# Altium PCB TriMod Adapter 2.PcbDoc (part 2 of 2)
Units mm, origin at the board's own origin, x right, y up, seen from the top; angles counter-clockwise.
Board outline 35.81 x 82.55 mm, 2 copper layers (Top Layer, Bottom Layer), stack 0.969 mm thick; 35 components, 110 nets, 330 pads, 112 vias.
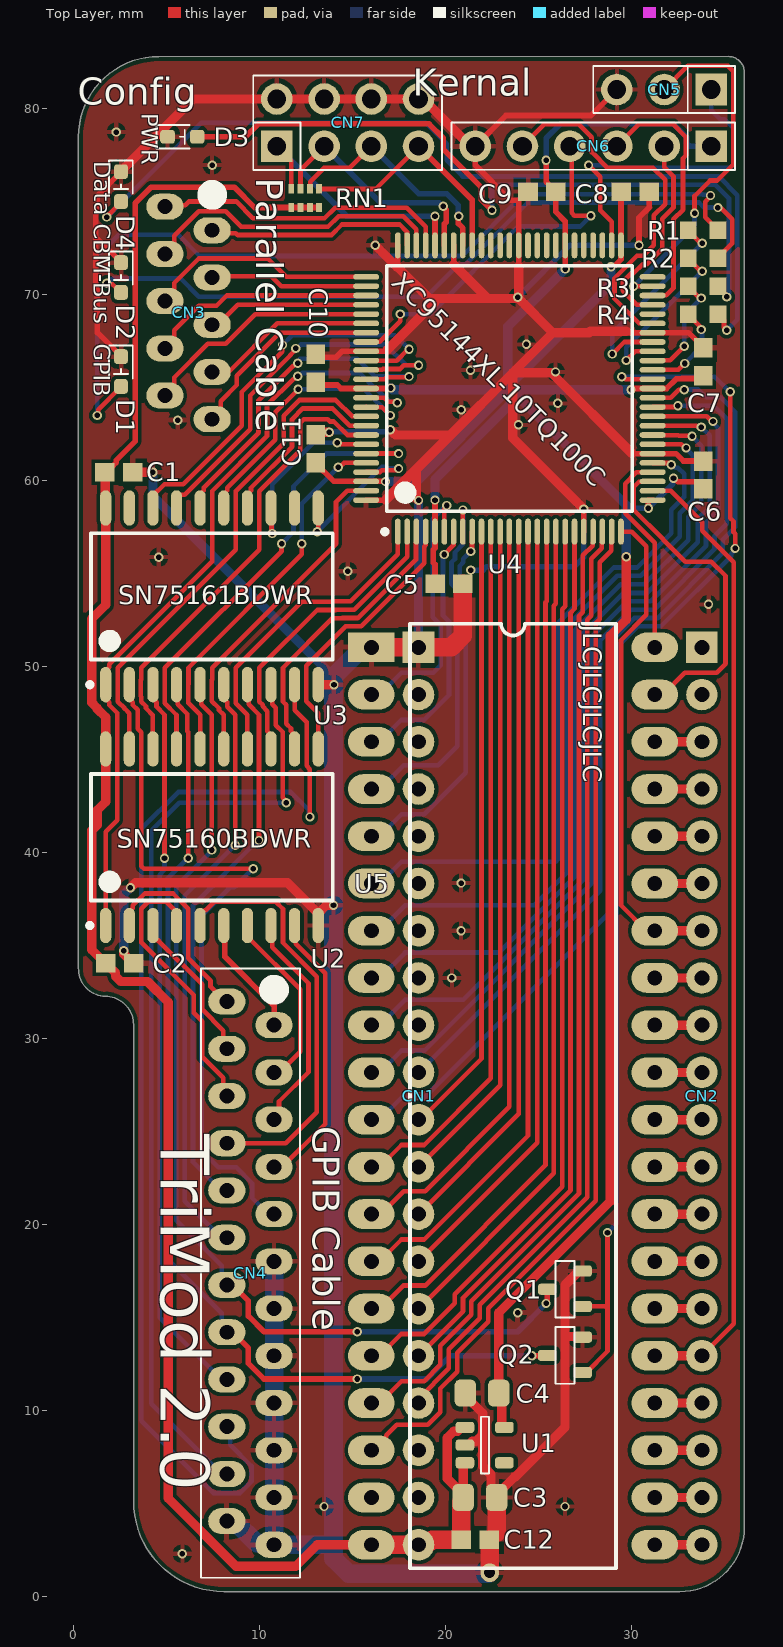
[diagram p0: Top Layer view]

## Via types
v1: diameter 0.5, hole 0.3, Top Layer to Bottom Layer, tented both sides, 111 vias
v2: diameter 1, hole 0.6, Top Layer to Bottom Layer, tented both sides, 1 vias

## Nets (pads, with @x,y where several pads share a name; then routed paths per layer and width w, separated by ;. In a path a pad name is that pad's centre, name@x,y a point inside that pad or via, vN(x,y) a via of type N, cw(c..) or ccw(c..) an arc to the next point about the centre after c; other vN are vias at no path point) (continued)
VIA_PB3: (continued)
  Top Layer w0.25: U5.13 16.51,20.55 17.743,21.783 18.896,21.783 23.428,26.314 23.428,55.773 U4.13
VIA_PB4: U4.15 U5.14 | length 43.7
  Top Layer w0.25: U5.14 16.452,18.01 17.627,19.185 18.839,19.185 24.428,24.774 U4.15
VIA_PB5: U4.17 U5.15 | length 46.7
  Top Layer w0.25: U5.15 16.486,15.47 17.725,16.709 18.902,16.709 25.367,23.173 25.367,53.446 25.428,53.507 U4.17
VIA_PB6: U4.19 U5.16 | length 49.6
  Top Layer w0.25: U5.16 16.452,12.93 17.627,14.105 18.839,14.105 20.485,15.751 20.485,16.236 26.267,22.018 26.267,53.073 26.428,53.234 U4.19
VIA_PB7: U4.22 U5.17 | length 52.8
  Top Layer w0.25: U5.17 16.452,10.39 17.627,11.565 18.839,11.565 19.717,12.443 19.717,13.469 21.385,15.137 21.385,15.863 27.167,21.645 27.167,52.701 27.378,52.912 27.378,55.978 27.903,56.503 27.903,56.661 27.928,56.686 U4.22
pads on no net: CN1.2 CN1.3 CN1.4 CN1.5 CN1.6 CN1.7 CN1.8 CN1.9 CN1.18 CN1.19 CN2.1 CN2.2 U1.4 U3.12 U3.19 U4.46 U4.50 U4.53 U4.54 U4.55 U4.56 U4.58 U4.59 U4.60 U4.61 U4.63 U4.64 U4.65 U4.66 U5.19

## Polygon pours and split planes (outlines as drawn)
GND on Top Layer "Top Layer - GND" (solid, remove dead copper, pour order 0): 1.693,32.258 cw(c1.693,30.734) 3.217,30.734 3.217,5.08 ccw(c8.043,5.08) 8.043,0.254 31.496,0.254 32.599,0.254 ccw(c32.599,3.723) 36.068,3.723 36.068,81.683 ccw(c35.201,81.683) 35.201,82.55 4.568,82.546 ccw(c4.568,78.232) 0.254,78.232 0.254,33.782 ccw(c1.735,33.74)
GND on Bottom Layer "Bottom Layer - GND" (solid, remove dead copper, pour order 1): 1.693,32.258 cw(c1.693,30.734) 3.217,30.734 3.217,5.08 ccw(c8.043,5.08) 8.043,0.254 31.496,0.254 32.599,0.254 ccw(c32.599,3.723) 36.068,3.723 36.068,81.683 ccw(c35.201,81.683) 35.201,82.55 4.568,82.546 ccw(c4.568,78.232) 0.254,78.232 0.254,33.782 ccw(c1.735,33.74)

## Silkscreen, mask and mechanical layers (free items; w line width, h text height)
Top Overlay:
  text "JLCJLCJLCJLC" at 27.405,52.248 h1 r270
  text "TriMod 2.0" at 3.806,24.844 h4.5 r270
Bottom Overlay:
  drawing of 70 lines, arcs and shapes, not listed
  text "GND" at 28.072,80.364 h2
  text "GND" at 7.974,78.245 h2 r270
  text "TDI" at 23.468,73.985 h2 r270
  text "TCK" at 28.548,73.078 h2 r270
  text "TDO" at 26.008,73.046 h2 r270
  text "TMS" at 31.088,73.062 h2 r270
  text "GND" at 20.928,72.911 h2 r270
  text "+3V3" at 33.629,72.635 h2 r270
  text "Mode" at 12.812,72.24 h2 r270
  text "2nd Kernal" at 10.261,67.605 h2 r270
  text "Device ID#1" at 17.88,67.094 h2 r270
  text "Device ID#2" at 15.34,66.988 h2 r270
  text "Version: 2.3 / Revision: - / Date: 28.12.2020" at 29.987,54.864 h1 r270
  text "TriMod 2.0" at 23.632,39.672 h4.5 r270
Board:
  lines w0.1: 0.254,33.782 ccw(c1.735,33.74) 1.693,32.258 cw(c1.693,30.734) 3.217,30.734 3.217,5.503 3.217,5.077 ccw(c8.04,5.077) 8.04,0.254 31.496,0.254 32.599,0.254 ccw(c32.599,3.723) 36.068,3.723 36.068,81.937 ccw(c35.201,81.937) 35.201,82.804 4.568,82.8 ccw(c4.568,78.486) 0.254,78.486 0.254,33.782